# Altium PCB machkiemtranguon.PcbDoc (part 1 of 2)
Units mm, origin at the board's own origin, x right, y up, seen from the top; angles counter-clockwise.
Board outline 125.2 x 94.23 mm, 2 copper layers (Top Layer, Bottom Layer); 89 components, 67 nets, 385 pads, 74 vias.
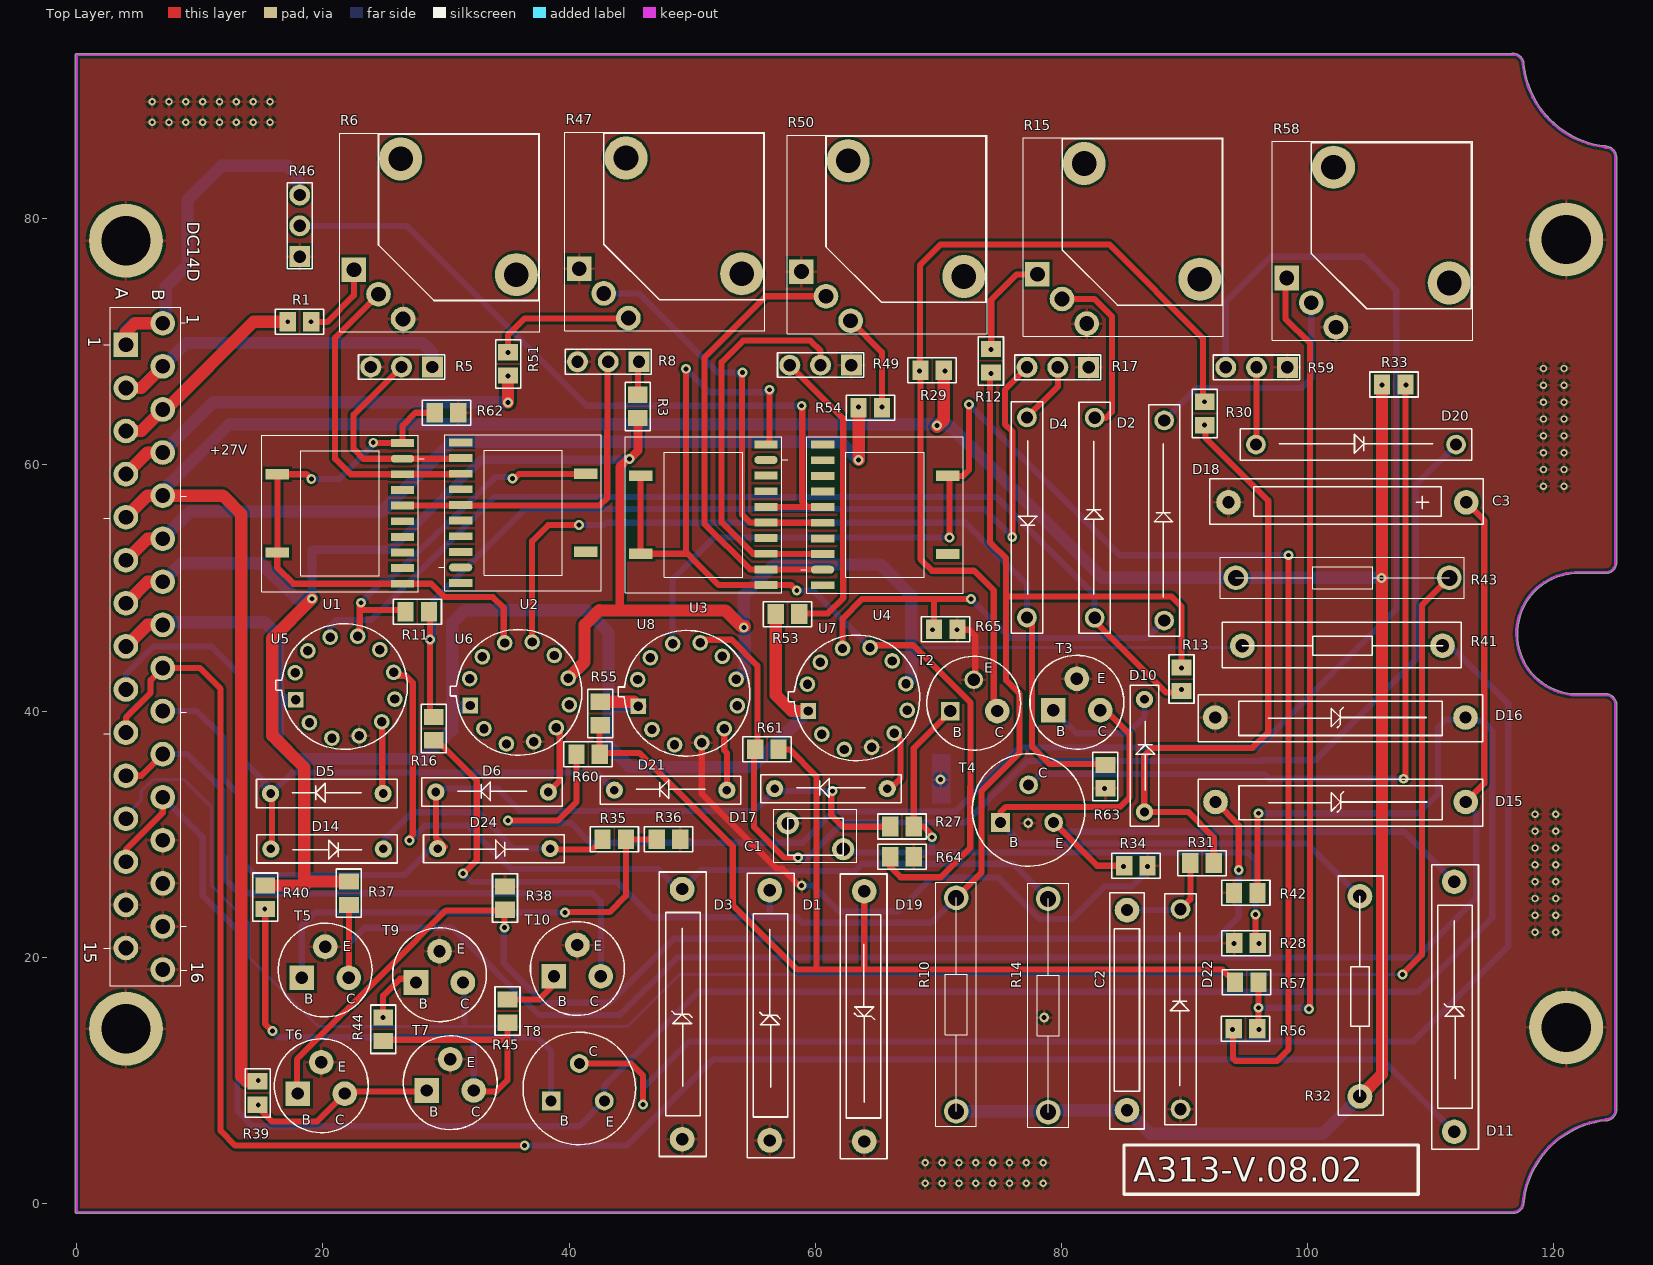
[diagram p0: Top Layer view]
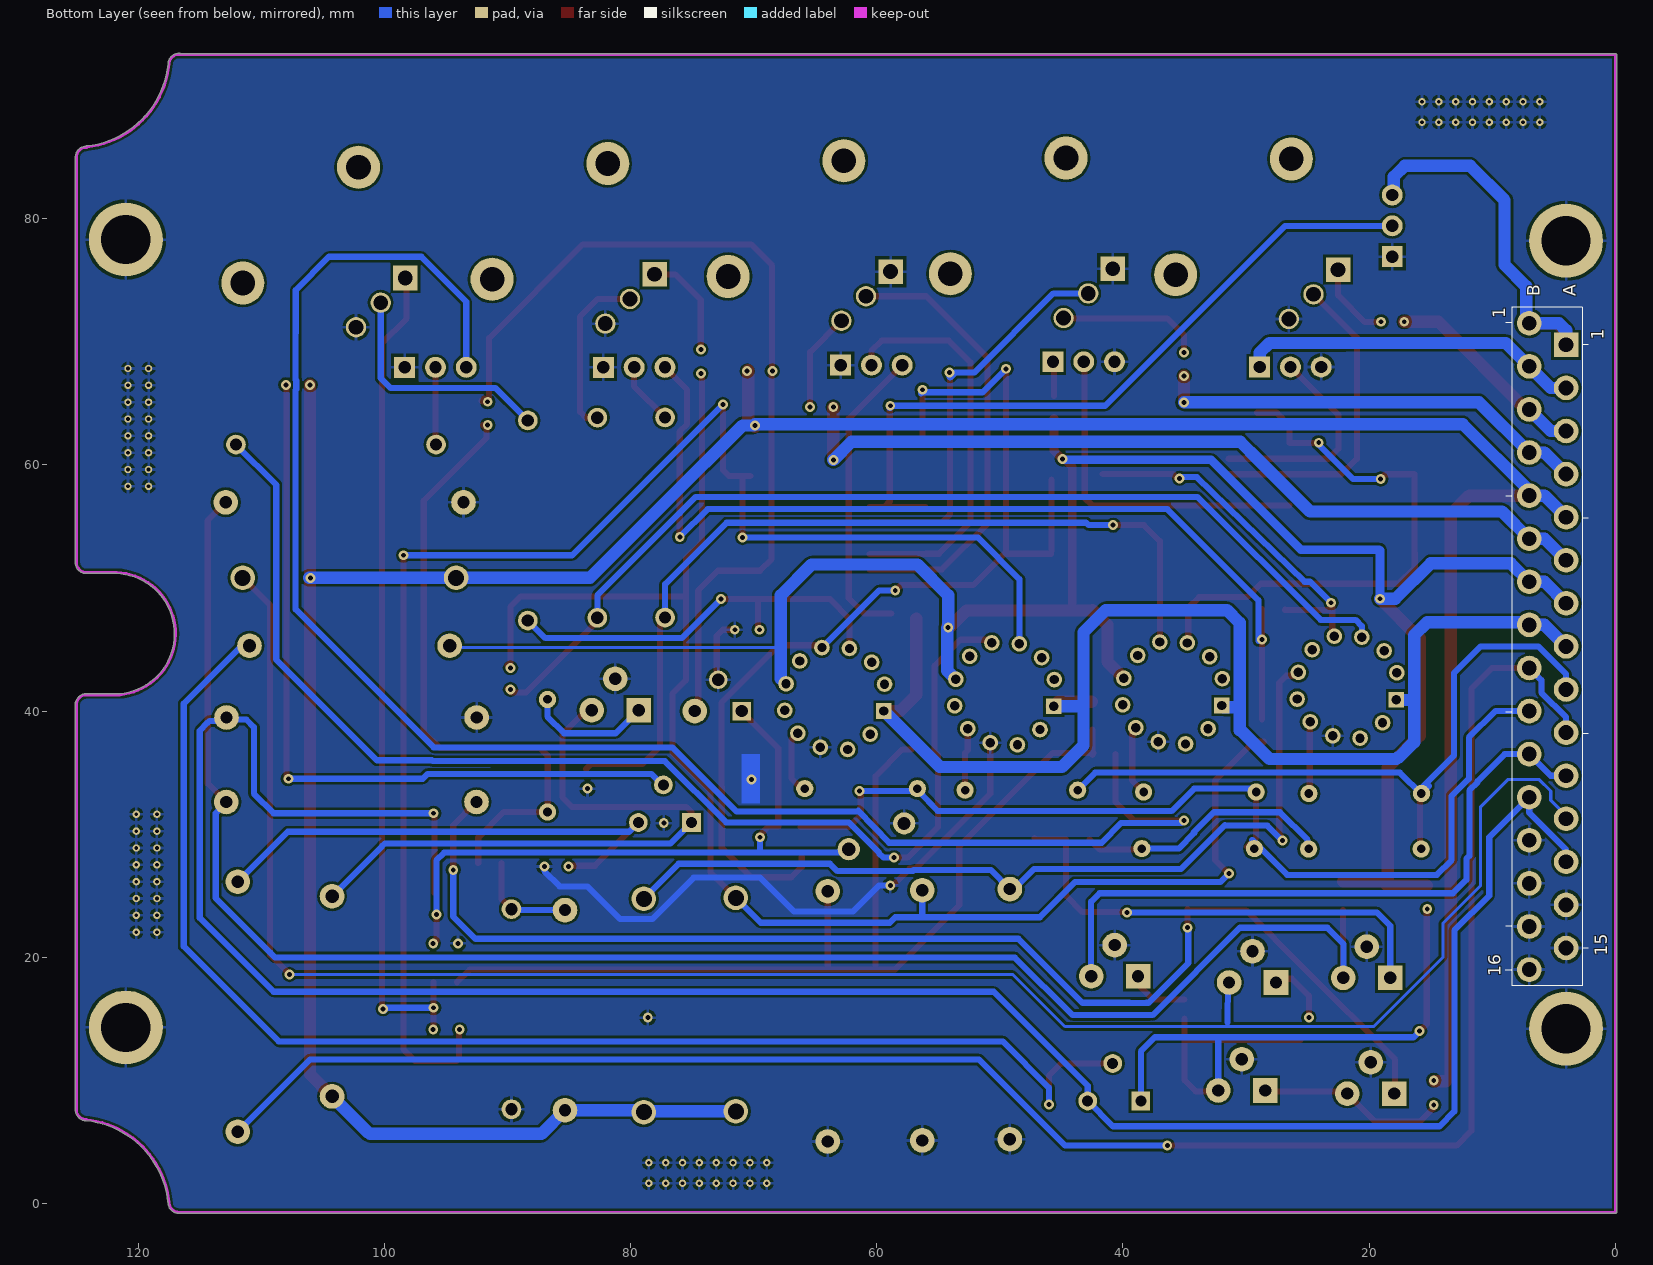
[diagram p1: Bottom Layer view, seen from below]

## Layer stack, top to bottom
Top Solder: solder mask 0.0102, Solder Resist, Dk 3.5
Top Layer: signal copper 0.0356
Dielectric1: dielectric 0.32, FR-4, Dk 4.8
Bottom Layer: signal copper 0.0356
Bottom Solder: solder mask 0.0102, Solder Resist, Dk 3.5

## Board outline
0,-0.8 116.684,-0.8 ccw(c116.697,-0.701) 116.699,-0.801 ccw(c116.684,0.088) 117.573,0.088 ccw(c116.684,0.088) 117.573,0.101 ccw(c117.476,0.125) 117.575,0.114 cw(c124.997,-0.7) 124.211,6.724 ccw(c124.222,6.824) 124.224,6.724 ccw(c124.209,7.613) 125.089,7.485 ccw(c124.997,7.525) 125.097,7.525 125.097,7.573 ccw(c124.209,7.613) 125.098,7.613 ccw(c124.209,7.613) 125.097,7.652 125.097,40.513 ccw(c124.998,40.525) 125.098,40.525 ccw(c124.998,40.525) 125.098,40.527 ccw(c124.209,40.512) 125.097,40.552 125.097,40.65 ccw(c124.997,40.65) 125.075,40.713 ccw(c124.209,40.512) 124.368,41.387 ccw(c124.318,41.3) 124.318,41.4 124.25,41.4 ccw(c124.209,40.512) 124.169,41.4 121.502,41.4 cw(c121.949,46.279) 121.779,51.176 ccw(c121.797,51.275) 121.797,51.175 124.21,51.175 ccw(c124.222,51.274) 124.224,51.174 ccw(c124.209,52.063) 125.083,51.898 ccw(c124.997,51.95) 125.097,51.95 125.097,52.023 ccw(c124.209,52.063) 125.098,52.063 ccw(c124.209,52.063) 125.097,52.102 125.097,84.993 ccw(c124.997,85.001) 125.098,85.001 ccw(c124.997,85.001) 125.098,85.002 ccw(c124.21,84.988) 124.243,85.875 ccw(c124.172,85.804) 124.183,85.903 cw(c124.997,93.325) 117.573,92.539 ccw(c117.473,92.55) 117.573,92.55 ccw(c117.473,92.55) 117.573,92.552 ccw(c116.684,92.537) 116.642,93.425 ccw(c116.647,93.325) 116.581,93.4 -0.003,93.4 ccw(c-0.003,93.3) -0.1,93.276 -0.1,-0.7 ccw(c0,-0.7)

## Design rules (kind name [scope] priority, off if disabled: settings)
Clearance [All] p1: gap=0.2 ignorepadtopadclearanceinfootprint=FALSE
HoleSize [All] p1: absolutevalues=TRUE maxlimit=5 minlimit=0.025 maxpercent=80.000 minpercent=20.000
MinimumSolderMaskSliver [All] p1: minsoldermaskwidth=0
PolygonConnect [All] p1: connectstyle=Relief reliefconductorwidth=0.254 reliefentries=4 polygonreliefangle="90 Angle" airgapwidth=0.254
RoutingVias [All] p1: holewidth=0.4 width=0.8 viastyle="Through Hole" minholewidth=0.4 minwidth=0.8 maxholewidth=0.4 maxwidth=0.8
SilkToSilkClearance [All] p1: silktosilkclearance=0.05
SilkToSolderMaskClearance [IsPad] p1: minsilkscreentomaskgap=0 clearancetoexposedcopper=TRUE
SolderMaskExpansion [All] p1: expansion=0.102
Width [All] p1: maxlimit=2 minlimit=0.254 preferedwidth=0.5 minimp=50.000000 maximp=50.000000 favimp=50.000000
26 further rules are at their usual default settings.

## Components (designator, comment, footprint, x,y, rotation, side; value= is the part's Value field where it differs from the comment)
C1 "ceramic" CAP_KM_5B 57.772,30.875 r0 top
C2 "3,3u" CAPK52_1 85.322,7.575 r90 top
C3 "15u" CAPK53_1A 93.572,56.95 r0 top
D1 "D818D" DIODE_D818 53.197,26.7 r270 top
D2 "2D510A" DIODE640_2D510 82.697,47.575 r90 top
D3 "DIODE ZENER" DIODE_D818 46.072,26.8 r270 top
D4 "2D510A" DIODE640_2D510 77.197,63.85 r270 top
D5 "2D103A" DIODE_2D103A 24.897,33.3 r180 top
D6 "2D103A" DIODE_2D103A 38.322,33.425 r180 top
D10 "2D103A" DIODE_2D103A 86.747,31.8 r90 top
D11 "2456A" DIODE_D818 108.797,27.4 r270 top
D14 "2D103A" DIODE_2D103A 15.772,28.8 r0 top
D15 "D818D" DIODE_D818 114.097,35.725 r180 top
D16 "2456A" DIODE_D818 114.083,42.586 r180 top
D17 "2D103A" DIODE_2D103A 65.847,33.7 r180 top
D18 "2D510A" DIODE640_2D510 88.347,47.35 r90 top
D19 "D818D" DIODE_D818 67.097,3.775 r90 top
D20 "2D510A" DIODE640_2D510 95.797,61.65 r0 top
D21 "2D103A" DIODE_2D103A 52.822,33.575 r180 top
D22 "2D510A" DIODE640_2D510 89.672,7.65 r90 top
D24 "2D103A" DIODE_2D103A 29.322,28.825 r0 top
DC14B "CON31" DC14B 15.66,43.726 r0 top
R1 "1,8k" RES0805 20.572,71.75 r180 top
R3 "5,6k" RES0805 45.447,67.225 r270 top
R5 "4,7k" res_var_cp5_3_4 28.937,67.95 r180 top
R6 "4,7k" res_var_cp5_3_3 21.361,70.686 r0 top
R8 "4,7k" res_var_cp5_3_4 45.722,68.375 r180 top
R10 "1,5k" RES_1W 71.447,24.825 r270 top
R11 "120k" RES0805 30.147,48.2 r180 top
R12 "4,7k" RES0805 74.147,70.925 r270 top
R13 "47k" RES0805 89.877,40.112 r90 top
R14 "1k" RES_1W 78.922,24.75 r270 top
R15 "4,7k" res_var_cp5_3_3 76.886,70.311 r0 top locked
R16 "5,1k" RES0805 28.872,41.05 r270 top
R17 "4,7k" res_var_cp5_3_4 82.247,67.925 r180 top
R27 "10k" RES0805 69.522,30.75 r180 top
R28 "2,2k" RES0805 97.47,21.277 r180 top
R29 "5,6k" RES0805 71.972,67.8 r180 top
R30 "22k" RES0805 91.522,66.65 r270 top
R31 "27k" RES0805 88.947,27.525 r0 top
R32 "3,9k" RES_05W 104.247,24.95 r270 top
R33 "150r" RES0805 104.522,66.4 r0 top
R34 "560r" RES0805 83.572,27.3 r0 top
R35 "10k" RES0805 41.197,29.45 r0 top
R36 "2,2k" RES0805 50.547,29.725 r180 top
R37 "3,3k" RES0805 22.247,22.726 r90 top
R38 "1,5k" RES0805 34.672,27.275 r270 top
R39 "27k" RES0805 14.822,6.5 r90 top
R40 "2,2k" RES0805 15.447,22.4 r90 top
R41 "390r" RES_05W 94.697,45.3 r0 top
R42 "1,5k" RES0805 92.497,25.1 r0 top
R43 "2,7k" RES_1W 94.172,50.825 r0 top
R44 "4,3k" RES0805 25.024,11.676 r90 top
R45 "8,2k" RES0805 34.872,18.1 r270 top
R46 "4,7k" res_var_cp5_3_4 18.122,76.875 r90 top
R47 "4,7k" res_var_cp5_3_3 39.661,70.761 r0 top
R49 "4,7k" res_var_cp5_3_4 62.972,68.1 r180 top
R50 "4,7k" res_var_cp5_3_3 57.711,70.536 r0 top locked
R51 "1,8k" RES0805 35.172,65.725 r90 top
R53 "5,6k" RES0805 55.272,47.75 r0 top
R54 "12k" RES0805 61.998,64.523 r0 top
R55 "330r" RES0805 42.408,42.274 r270 top
R56 "47k" RES0805 97.422,14.325 r180 top
R57 "5,1k" RES0805 97.522,18.1 r180 top
R58 "4,7k" res_var_cp5_3_3 97.136,70.011 r0 top
R59 "4,7k" res_var_cp5_3_4 98.387,67.925 r180 top
R60 "4,7k" RES0805 44.022,36.625 r180 top
R61 "47k" RES0805 58.547,37.025 r180 top
R62 "120k" RES0805 27.572,64.1 r0 top
R63 "120k" RES0805 83.447,37.15 r270 top
R64 "120k" RES0805 69.522,28.3 r180 top
R65 "120k" RES0805 73.072,46.775 r180 top
T2 "2T312B" to_2t312b_bec#1 71.097,40 r0 top
T3 "2T312B" to_2t312b_bec#2 79.472,40.075 r0 top
T4 "2T608B" to_2t608b_bce 75.047,30.95 r0 top
T5 "2T312B" to_2t312b_bec#2 18.414,18.325 r0 top
T6 "2T312B" to_2t312b_bec#2 18.097,8.925 r0 top
T7 "2T312B" to_2t312b_bec#2 28.572,9.178 r0 top
T8 "2T608B" to_2t608b_bce 38.547,8.325 r0 top
T9 "2T312B" to_2t312b_bec#2 27.697,17.95 r0 top
T10 "2T312B" to_2t312b_bec#2 38.897,18.45 r0 top
U1 "2D908A" 2D908_917A 15.042,50.086 r0 top
U2 "2D917A" 2D908_917A 42.622,62.075 r180 top
U3 "2D917A" 2D908_917A 44.567,49.981 r0 top
U4 "2D908A" 2D908_917A 72.022,61.9 r180 top
U5 "to12_pin" k140ud1_1 16.297,42.375 r0 top
U6 "to12_pin" k140ud1_1 30.472,41.9 r0 top
U7 "to12_pin" k140ud1_1 57.922,41.45 r0 top
U8 "to12_pin" k140ud1_1 44.122,41.825 r0 top

## Footprints (in the part's own frame and the unit in brackets; to place one, negate y for a bottom-side part, rotate by r counter-clockwise, add the part's x,y. Pads: shape width x height; smd on the part's side, far side on the other; paste and mask are expansions set on the pad)
2D908_917A [mil]
  oval 75x25 smd: 1(450,410)
  rect 75x25 smd: 2(450,360) 3(450,310) 4(450,260) 5(450,210) 6(450,160) 7(450,110) 8(450,60) 9(450,10) 12(450,460)
  rect 75x33 smd: 10(50,110) 11(50,360)
  silkscreen extent 0,-15 520,485
CAP_KM_5B [mm]
  round 1.8 hole 1.067: 1(4.5,-2.1) 2(0,0)
  silkscreen extent -1.14,-3.17 5.59,1.14
CAPK52_1 [mm]
  round 2 hole 1: 1(0,0) 2(16.256,0)
  silkscreen extent -1.52,-1.4 17.65,1.4
CAPK53_1A [mm]
  round 2 hole 1: 1(19.304,0) 2(0,0)
  silkscreen extent -1.52,-1.78 20.7,1.91
DC14B [mm]
  rect 2x2 hole 1.2: 1(-11.66,26.024)
  round 2 hole 1.2: 2(-8.66,27.774) 3(-11.66,22.524) 4(-8.66,24.274) 5(-11.66,19.024) 6(-8.66,20.774) 7(-11.66,15.524) 8(-8.66,17.274) 9(-11.66,12.024) 10(-8.66,13.774) 11(-11.66,8.524) 12(-8.66,10.274) 13(-11.66,5.024) 14(-8.66,6.774) 15(-11.66,1.524) 16(-8.66,3.274) 17(-11.66,-1.976) 18(-8.66,-0.226) 19(-11.66,-5.476) 20(-8.66,-3.726) 21(-11.66,-8.976) 22(-8.66,-7.226) 23(-11.66,-12.476) 24(-8.66,-10.726) 25(-11.66,-15.976) 26(-8.66,-14.226) 27(-11.66,-19.476) 28(-8.66,-17.726) 29(-11.66,-22.976) 30(-8.66,-21.226) 31(-8.66,-24.726)
  silkscreen extent -13.47,-26.03 -6.73,29.08
DIODE640_2D510 [mm]
  round 1.6 hole 1: 1(0,0) 2(16.256,0)
  silkscreen extent -1.27,-1.27 17.53,1.27
DIODE_2D103A [mm]
  round 1.4 hole 0.7: 1(0,0) 2(9.144,0)
  silkscreen extent -1.14,-1.14 10.29,1.14
DIODE_D818 [mm]
  round 2 hole 1: 1(21.581,3.112) 2(1.261,3.112)
  silkscreen extent -0.13,1.27 22.99,5.08
k140ud1_1 [mil]
  rect 50x50 hole 30: 1(59,-57)
  round 50 / inner round 60 / far side round 50 hole 30: 2(103,-131) 3(175,-180) 4(262,-173) 5(334,-128) 6(376,-55) 7(372,30) 8(328,103) 9(257,146) 10(169,143) 11(98,99) 12(57,29)
  silkscreen extent -5,-216 416,186
RES0805 [mil]
  rect 52x63 smd: 1(134.8,5) 2(60,5)
  silkscreen extent 20,-35 175,45
RES_1W [mm]
  round 2 hole 1.3: 1(17.335,0) 2(0,0)
  silkscreen extent -1.27,-1.65 18.54,1.65
RES_05W [mm]
  round 2 hole 1.092: 1(0,0) 2(16.256,0)
  silkscreen extent -1.65,-1.78 17.78,1.91
res_var_cp5_3_3 [mm]
  rect 2x2 hole 1.2: 1(1.161,5.164)
  round 2 / inner oval 2x1.524 / far side round 1.651 hole 1.2: 2(3.161,3.164) 3(5.161,1.164)
  round 3.5 hole 2: 4(4.961,14.164) 5(14.361,4.764)
  silkscreen extent 0,0.13 16.26,16.26
res_var_cp5_3_4 [mm]
  rect 1.7x1.7 hole 1: 1(0.04,0)
  round 1.7 hole 1: 2(2.54,0) 3(5.04,0)
  silkscreen extent -0.96,-1 6.04,1
to_2t312b_bec#1 [mm]
  rect 1.5x1.5 hole 1: 1(-0.127,0)
  round 1.5 hole 1: 2(1.778,2.54)
  round 2 hole 1: 3(3.683,0)
  silkscreen extent -2.03,-3.17 5.59,4.44, body extent -2.04,-3.19 5.6,4.46, height 3.81
to_2t312b_bec#2 [mm]
  rect 2x2 hole 1: 1(-0.127,0)
  round 2 hole 1: 2(1.778,2.54) 3(3.683,0)
  silkscreen extent -2.03,-3.17 5.59,4.44, body extent -2.04,-3.19 5.6,4.46, height 3.81
to_2t608b_bce [mil]
  rect 60x60 hole 35: 1(0,0)
  round 60 hole 35: 2(170,0) 3(90,120)
  silkscreen extent -90,-140 270,220

## Part data
C1: library part "CAP NP"
C2: library part "CAP NP_Dup1"
C3: library part "CAP POL"
D1 D11 D15 D16 D19: library part "DIODE ZENER"
D2 D4 D5 D6 D10 D14 D17 D18 D20 D21 D22 D24: library part DIODE
R1 R3 R10 R11 R12 R13 R14 R16 R27 R28 R29 R30 R31 R32 R33 R34 R35 R36 R37 R38 R39 R40 R41 R42 R43 R44 R45 R51 R53 R54 R55 R56 R57 R60 R61 R62 R63 R64 R65: library part RESISTOR_0
R5: library part "RESISTOR VAR_3"
R6: library part "RESISTOR VAR_4"
R8: library part "RESISTOR VAR_5"
R15 R47 R50 R58: library part "RESISTOR VAR_1"
R17: library part "RESISTOR VAR_6"
R46: library part "RESISTOR VAR_10"
R49: library part "RESISTOR VAR_7"
R59: library part "RESISTOR VAR_8"
T2 T3 T4 T5 T6 T7 T8 T9 T10: library part "NPN ECB_0"
U1: library part LDS-A81R_20
U2: library part LDS-A81R_25
U3: library part LDS-A81R_22
U4: library part LDS-A81R_21
U5: library part K140UD1B_10
U6: library part K140UD1B_9
U7: library part K140UD1B_8
U8: library part K140UD1B_13

## Free pads (board coordinates)
  round 6 hole 4: 0(4,14.2) 0(4,78.2) 0(120.997,14.3) 0(120.997,78.3)
  round 0.6 hole 0.3: 1(6.132,87.825) 1(6.132,89.5) 1(7.5,89.5) 1(7.5,87.825) 1(8.868,89.5) 1(8.868,87.825) 1(10.236,89.5) 1(10.236,87.825) 1(11.604,89.5) 1(11.604,87.825) 1(12.971,89.5) 1(12.971,87.825) 1(14.339,89.5) 1(14.339,87.825) 1(15.707,89.5) 1(15.707,87.825) 1(68.935,1.643) 1(68.935,3.318) 1(70.303,3.318) 1(70.303,1.643) 1(71.671,3.318) 1(71.671,1.643) 1(73.039,3.318) 1(73.039,1.643) 1(74.407,3.318) 1(74.407,1.643) 1(75.774,3.318) 1(75.774,1.643) 1(77.142,3.318) 1(77.142,1.643) 1(78.51,3.318) 1(78.51,1.643) 1(118.475,22.037) 1(118.475,23.405) 1(118.475,24.773) 1(118.475,26.14) 1(118.475,27.508) 1(118.475,28.876) 1(118.475,30.244) 1(118.475,31.612) 1(119.151,58.25) 1(119.151,59.618) 1(119.151,60.986) 1(119.151,62.354) 1(119.151,63.721) 1(119.151,65.089) 1(119.151,66.457) 1(119.151,67.825) 1(120.15,22.037) 1(120.15,23.405) 1(120.15,24.773) 1(120.15,26.14) 1(120.15,27.508) 1(120.15,28.876) 1(120.15,30.244) 1(120.15,31.612) 1(120.826,58.25) 1(120.826,59.618) 1(120.826,60.986) 1(120.826,62.354) 1(120.826,63.721) 1(120.826,65.089) 1(120.826,66.457) 1(120.826,67.825)

## Via types
v1: diameter 0.8, hole 0.4, Top Layer to Bottom Layer, 74 vias

## Nets (pads, with @x,y where several pads share a name; then routed paths per layer and width w, separated by ;. In a path a pad name is that pad's centre, name@x,y a point inside that pad or via, vN(x,y) a via of type N, cw(c..) or ccw(c..) an arc to the next point about the centre after c; other vN are vias at no path point)
4: D11.1 DC14B.18 DC14B.19 | length 160.4
  Top Layer w0.5: DC14B.19@4,38.25 4,39.475 6,41.475 6,42.5 DC14B.18@7,43.5 10,43.5 11.697,41.803 11.697,5.9 12.897,4.7 v1(36.397,4.7)
  Bottom Layer w0.5: DC14B.19@4,38.25 4,39.5 6,41.5 6,42.5 DC14B.18@7,43.5 ; v1@36.297,4.7 v1(36.397,4.7) 44.697,4.7 51.697,11.7 106.028,11.7 D11.1@111.909,5.819
8: D6.2 D17.2 D24.1 DC14B.20 R27.1 | length 80.5
  Top Layer w0.5: D6.2@29.178,33.7 D6.2@29.178,33.425 29.178,29.694 D24.1@29.897,28.975 ; v1@61.297,33.5 61.297,31.55 62.247,30.6 R27.1@66.172,30.6
  Bottom Layer w0.5: DC14B.20@7,40 9.75,40 11.897,37.853 11.897,34.5 13.297,33.1 13.297,27.9 14.501,26.696 26.668,26.696 29.497,29.525 ; D6.2@29.178,33.7 34.227,33.7 36.046,31.88 55.058,31.88 56.597,33.5 56.597,33.768 56.865,33.5 v1(61.397,33.5)
10: DC14B.23 R43.1 T9.3 | length 159.2
  Top Layer w0.5: v1(107.697,18.6) 109.286,20.189 109.286,48.603 R43.1@111.507,50.825
  Bottom Layer w0.254: DC14B.23@4,31.25 4,31.5 5.25,32.75 5.25,33.5 6.178,34.428 8.75,34.428 10.947,32.231 10.947,25.825 14,22.772 14,19.997 19.624,14.373 44.72,14.373 48.947,18.6 v1(107.697,18.6)
  Bottom Layer w0.5: 31.497,14.7 31.474,17.951 T9.3@31.472,18.242 ; T9.3@31.872,18.275 T9.3@31.472,18.242 ; T9.3@31.88,18.25 T9.3@31.472,18.242
16: D16.2 DC14B.24 DC14B.25 R42.1 T8.2 | length 198.9
  Top Layer w0.5: DC14B.25@4,27.75 4,28.75 7,31.75 DC14B.24@7,33 ; R42.1@95.921,25.227 v1@95.921,31.543
  Bottom Layer w0.5: DC14B.25@4,27.75 4,28.75 7,31.75 DC14B.24@7,33 10.25,29.75 10.25,25 13.072,22.178 13.072,7.475 14.273,6.274 40.814,6.274 T8.2@42.865,8.325 42.865,9.568 50.493,17.196 108.993,17.196 114.997,23.2 114.997,38.4 114.366,39.031 114.197,39.2 D16.2@112.797,39.2 ; v1(95.997,31.7) 108.997,31.7 110.597,33.3 110.597,38.7 111.197,39.3 D16.2@112.997,39.3 ; D16.2@112.822,39.475 112.897,39.4 D16.2@112.997,39.3 ; D16.2@113.097,39.3 D16.2@112.997,39.3
17: DC14B.21 DC14B.22 T10.3 | length 58.7
  Top Layer w0.5: DC14B.21@4,34.75 5.25,34.75 DC14B.22@7,36.5
  Bottom Layer w0.5: DC14B.21@4,34.75 5.25,34.75 DC14B.22@7,36.5 9,36.5 11.197,34.303 11.197,34.21 11.851,33.556 11.851,28.25 12.097,28.004 12.097,26.3 13.197,25.2 41.897,25.2 42.582,24.515 T10.3@42.582,17.925
18: D5.2 D14.1 D21.2 DC14B.17 | length 57.9
  Top Layer w0.5: D14.1@15.878,28.8 D5.2@15.878,33.625
  Bottom Layer w0.5: DC14B.17@4,41.75 4,42.991 6.259,45.25 10.947,45.25 13.097,43.1 13.097,36.4 15.753,33.744 D5.2@15.753,33.3 ; 15.153,33.9 D5.2@15.653,33.4 ; D5.2@15.697,33.2 17.497,35 42.253,35 D21.2@43.678,33.575
+5b: DC14B.3 DC14B.4 R5.1 | length 31.9
  Top Layer w1: DC14B.3@4,66.25 5.25,66.25 DC14B.4@7,68
  Bottom Layer w1: DC14B.3@4,66.25 5.25,66.25 DC14B.4@7,68 8.901,69.901 28.096,69.901 28.897,69.1 R5.1@28.897,67.95 ; 21.597,69.9 21.897,69.9
+6.3b: DC14B.5 DC14B.6 R1.1 | length 20.5
  Top Layer w1: DC14B.5@4,62.75 5.25,62.75 DC14B.6@7,64.5 7.251,64.5 14.374,71.623 v1(17.148,71.623)
  Bottom Layer w1: DC14B.5@4,62.75 5.25,62.75 DC14B.6@7,64.5
+12.6b: DC14B.13 DC14B.14 R3.1 R37.1 R40.1 R41.1 U6.7 U7.7 U8.7 | length 188.7
  Top Layer w0.7: 44.118,50.682 44.122,59.574 ; 44.122,48.325 44.122,59.574 ; 44.122,59.726 44.122,59.574 ; R3.1@45.597,63.8 45.597,61.15 v1(44.922,60.475) 44.755,60.475 44.122,59.842 44.122,59.574
  Top Layer w1: DC14B.13@4,48.75 5.75,50.5 DC14B.14@7,50.5 ; R40.1@15.32,25.824 18.497,25.824 ; v1(19.116,49.124) 15.897,45.905 15.897,38 18.497,35.4 18.497,25.824 ; R37.1@22.12,26.15 18.823,26.15 18.497,25.824 ; U6.7@39.921,42.662 41.25,43.991 41.25,47 41.276,47 42.474,48.197 52.715,48.176 54.011,46.88 v1@54.277,46.88
  Bottom Layer w0.254: 67.788,45.009 67.927,45.148 94.445,45.148 94.545,45.148 R41.1@94.697,45.3
  Bottom Layer w0.7: v1(19.116,49.124) 19.116,53.056 19.171,53.112 25.542,53.112 32.83,60.4 v1@44.697,60.4
  Bottom Layer w1: DC14B.13@4,48.75 5.75,50.5 DC14B.14@7,50.5 8.5,52 15,52 17.876,49.124 v1(19.116,49.124) ; U8.7@53.597,42.6 54.263,43.266 54.263,46.734 v1(54.197,46.8) 54.197,49.4 56.697,51.9 65.297,51.9 67.788,49.409 67.788,45.009 67.788,42.629 U7.7@67.371,42.212 ; R41.1@94.445,45.148 R41.1@94.997,45.7
+27b: C2.1 DC14B.9 DC14B.10 R10.1 R14.1 R29.2 R32.2 R33.2 R39.1 R43.2 | length 267
  Top Layer w1: DC14B.9@4,55.75 5.75,57.5 DC14B.10@7,57.5 11.875,57.5 13.375,56 13.375,10.338 13.789,9.924 R39.1@14.695,9.924 ; v1@69.897,63.1 70.448,63.651 R29.2@70.448,67.673 ; R32.2@104.247,8.694 106.046,10.493 R33.2@106.046,66.527
  Bottom Layer w1: DC14B.9@4,55.75 5.75,57.5 DC14B.10@7,57.5 7,57.903 12.397,63.3 69.897,63.3 69.997,63.2 70.897,63.2 77.056,57.056 83.287,50.825 R43.2@94.172,50.825 v1@106.097,50.825 ; R10.1@71.447,7.49 R14.1@79.322,7.49 ; R14.1@78.872,7.575 C2.1@85.322,7.575 87.247,5.65 101.172,5.65 ; 101.278,5.725 R32.2@104.247,8.694
  other v1: 14.75,10 105.997,50.8 69.897,63.2 106.032,66.496 70.529,67.623
-5b: DC14B.1 DC14B.2 R46.3 | length 31.5
  Top Layer w1: DC14B.1@4,69.75 4,70.75 4.75,71.5 DC14B.2@7,71.5
  Bottom Layer w1: DC14B.1@4,69.75 4,70.925 4.575,71.5 DC14B.2@7,71.5 7.25,71.75 7.25,74.5 9,76.25 9,81.5 11.8,84.3 17.097,84.3 17.997,83.4 R46.3@17.997,82
-6.3b: DC14B.7 DC14B.8 R51.2 | length 39.4
  Top Layer w1: DC14B.7@4,59.25 5.75,61 DC14B.8@7,61 ; v1(35.045,65.075) R51.2@35.045,67.249
  Bottom Layer w1: DC14B.7@4,59.25 5.75,61 DC14B.8@7,61 11.075,65.075 v1(35.045,65.075)
  other v1: 35.032,67.223
-12.6b: DC14B.15 DC14B.16 R53.2 R55.2 U5.1 U6.1 U7.1 U8.1 | length 110.1
  Top Layer w1: DC14B.15@4,45.25 5.75,47 DC14B.16@7,47 ; R55.2@42.535,40.75 45.248,40.75 U8.1@45.621,40.377 ; U8.1@45.621,40.4 45.772,40.4 U8.1@45.772,40.45 ; R53.2@56.797,47.5 56.797,41.3 58.095,40.002 U7.1@59.421,40.002
  Bottom Layer w1: DC14B.15@4,45.25 5.75,47 DC14B.16@7,47 7.206,47.206 15.293,47.206 16.347,46.152 16.347,37.475 17.572,36.25 17.647,36.25 17.797,36.1 ; 16.372,41.051 16.372,40.9 U5.1@17.572,40.9 ; 17.858,36.1 28.097,36.1 30.497,38.5 ; 30.52,38.423 30.52,40.303 ; U6.1@31.8,40.303 30.52,40.303 ; 43.247,40.3 43.347,40.4 U8.1@45.597,40.4 ; U7.1@59.421,40.002 54.872,35.454 44.951,35.454 43.197,37.208 43.197,46.4 41.397,48.2 31.552,48.2 30.52,47.168 30.52,40.303
-20b: DC14B.11 DC14B.12 R54.2 | length 72.1
  Top Layer w1: DC14B.11@4,52.25 5.75,54 DC14B.12@7,54 ; v1(63.522,60.401) R54.2@63.522,64.65
  Bottom Layer w1: DC14B.11@4,52.25 5.75,54 DC14B.12@7,54 9.206,56.206 24.803,56.206 28.998,60.401 30.472,61.875 62.048,61.875 v1(63.522,60.401)
  other v1: 63.529,64.698
GND: C1.2 C3.2 D1.1 D3.1 D16.1 D19.2 D22.1 DC14B.26 DC14B.27 DC14B.28 DC14B.29 DC14B.30 DC14B.31 pad.0 pad.1 R5.3 R6.3 R8.3 R15.3 R17.1 R28.1 R34.1 R36.2 R38.2 R42.2 R46.1 R47.1 R49.1 R50.1 R58.3 R59.1 R62.1 R63.1 R64.2 R65.2 T2.2 T3.2 T5.2 T6.2 T7.2 T9.2 T10.2 U5.4 U6.4 U7.4 U8.4 | length 54.2
  Top Layer w0.5: U8.4@50.777,37.431 50.777,33.287 56.864,27.2 57.32,27.2 58.696,25.824 v1(58.897,25.824) ; R65.2@71.597,46.6 72.497,46.6 73,46.097 T2.2@73,42.415
  Bottom Layer w0.5: v1(58.897,25.824) 59.823,25.824 61.941,23.706 66.703,23.706 69.472,26.475 74.863,26.475 78.239,23.1 79.605,23.1 80.847,23.1 83.497,25.75 85.747,25.75 86.997,27 v1(86.997,27.375)
  other v1: 78.597,15.1 94.012,21.123 77.297,30.9 83.497,33.7 70.183,34.428 71.529,46.602
NetC1_1: C1.1 R27.2 R28.2 T2.1 | length 54.7
  Top Layer w0.5: v1(69.497,29.75) 69.497,29.908 68.782,30.623 R27.2@67.998,30.623 67.998,36.978 T2.1@71.095,40.075 ; v1(95.773,23.465) 95.773,21.323 R28.2@95.946,21.15
  Bottom Layer w0.5: C1.1@62.097,28.3 62.31,28.513 69.497,28.513 ; v1(69.497,29.75) 69.497,28.513 ; v1(95.773,23.465) 95.773,27.864 95.137,28.5 69.497,28.513
  other v1: 96.032,21.123
NetC2_2: C2.2 D22.2 R31.2 | length 8.7
  Top Layer w0.5: D22.2@89.672,23.906 90.471,24.705 R31.2@90.471,27.652
  Bottom Layer w0.5: C2.2@85.322,23.831 D22.2@89.972,23.831
NetC3_1: C3.1 D15.2 R37.2 T5.3 | length 141.2
  Top Layer w0.5: T5.3@21.997,18.4 22.12,18.523 R37.2@22.12,23.849 ; D15.2@112.836,32.613 114.34,34.117 114.34,55.486 C3.1@112.876,56.95
  Bottom Layer w0.5: T5.3@22.072,18.275 22.072,21.075 23.397,22.4 30.497,22.4 37.597,15.3 37.791,15.3 44.097,15.3 48.772,19.975 108.872,19.975 109.397,20.5 ; 109.272,20.375 113.697,24.8 113.697,31.7 D15.2@112.822,32.575
NetD1_2: D1.2 R10.2 R12.1 R13.1 R16.1 | length 123
  Top Layer w0.5: R16.1@28.549,37.501 29.367,37.501 32.497,34.371 32.497,27.9 v1(31.397,26.8) ; R10.2@71.447,24.825 73.509,26.888 ; 73.497,26.921 73.497,33.5 76.597,36.6 76.597,41.392 75.497,42.492 75.497,52.425 74.353,53.569 74.204,53.718 R12.1@74.204,67.4 ; 75.651,49.3 88.95,49.3 89.75,48.5 89.75,43.969 R13.1@89.995,43.724
  Bottom Layer w0.5: v1(31.397,26.8) 32.097,26.1 43.897,26.1 46.747,23.25 56.308,23.25 ; D1.2@56.309,25.439 56.308,23.25 ; R10.2@71.447,24.825 69.428,22.806 58.942,22.806 58.498,23.25 56.308,23.25
  other v1: 89.75,43.5 74.282,67.423
NetD2_1: D2.1 R13.2 U5.10 | length 82.8
  Top Layer w0.5: D2.1@82.697,47.575 82.697,47.303 88.5,41.5 89.671,41.5 R13.2@89.995,41.824
  Bottom Layer w0.5: U5.10@20.59,45.732 U5.10@20.59,46.007 20.59,46.893 21.097,47.4 23.945,47.4 33.945,57.4 74.697,57.4 75.997,56.1 ; 76.037,56.052 82.697,49.392 D2.1@82.697,47.575
  other v1: 89.75,41.75
NetD2_2: D2.2 R15.2 | length 14
  Top Layer w0.5: R15.2@80.047,73.475 82.674,73.475 84.097,72.052 84.097,64.3 83.628,63.831 D2.2@82.697,63.831
NetD3_2: D3.2 R14.2 U5.7 | length 71.6
  Top Layer w0.5: U5.7@25.746,42.862 26.735,42.862 27.297,42.3 27.297,29.96 26.897,29.56 26.99,29.468 v1@26.972,29.45
  Bottom Layer w0.5: v1(27.047,29.475) 28.272,30.7 31.697,30.7 ; 31.723,30.726 35.273,27.175 47.222,27.175 49.097,25.3 D3.2@49.197,25.3 ; D3.2@49.184,25.539 50.733,27.089 56.992,27.089 57.081,27 63.2,27 63.8,27.6 76.097,27.6 R14.2@78.697,25 ; R14.2@78.684,24.987 R14.2@78.922,24.75
NetD4_1: D4.1 R17.2 | length 5.1
  Top Layer w0.5: D4.1@77.197,63.85 79.707,66.36 R17.2@79.707,67.925
NetD4_2: D4.2 R63.2 U6.9 | length 73
  Top Layer w0.5: U6.9@37,45.608 37,53.8 ; v1(40.797,55.1) 38.3,55.1 ; D4.2@77.197,47.594 77.597,47.194 77.597,37.125 79.022,35.7 83.2,35.7 R63.2@83.599,35.301 ; 37,53.8 37,53.803 38.297,55.1 38.3,55.1 ; 37,53.8 38.3,55.1
  Bottom Layer w0.5: v1(40.797,55.1) 42.797,55.1 42.997,55.3 72.197,55.3 77.197,50.3 D4.2@77.197,47.594
NetD5_1: D5.1 U5.5 | length 4.6
  Top Layer w0.5: D5.1@24.822,33.775 24.822,38.4
NetD6_1: D6.1 U6.5 | length 5.6
  Top Layer w0.5: D6.1@38.397,33.5 39.247,34.35 39.247,38.357 U6.5@38.956,38.649
NetD10_1: D10.1 R30.1 R31.1 | length 51.3
  Top Layer w0.5: D10.1@86.722,31.7 86.722,36.358 87.372,37.008 89.409,37.008 89.417,37 93.474,37 93.482,37.008 95.519,37.008 96.797,38.286 96.797,57.1 91.697,62.2 91.697,62.961 R30.1@91.966,63.231 ; D10.1@86.747,31.8 90.297,31.8 92.371,29.726 R31.1@92.371,27.652
  other v1: 91.604,63.223
NetD10_2: D10.2 T3.1 | length 10.1
  Bottom Layer w0.5: T3.1@79.345,40.075 81.22,38.2 85.397,38.2 86.747,39.55 D10.2@86.747,40.944
NetD11_2: D11.2 R34.2 T4.2 | length 41.7
  Top Layer w0.5: T4.2@79.365,30.95 82.888,27.427 R34.2@85.096,27.427
  Bottom Layer w0.5: T4.2@79.365,30.95 80.115,30.2 107.848,30.2 D11.2@111.909,26.139
  other v1: 85.029,27.373
NetD14_2: D14.2 D24.2 R35.2 | length 21.4
  Top Layer w0.5: D24.2@38.497,29 38.747,28.75 41.894,28.75 R35.2@42.721,29.577
  Bottom Layer w0.5: D14.2@24.997,28.5 24.997,29.531 27.249,31.783 32.606,31.783 34.243,30.146 ; 34.197,30.1 35.472,28.825 D24.2@38.466,28.825
NetD15_1: D15.1 R38.1 T6.1 | length 103.7
  Top Layer w0.5: T6.1@17.97,8.925 T6.1@17.97,9.027 ; T6.1@17.97,9.327 T6.1@17.97,9.027 ; T6.1@18.097,8.9 T6.1@17.97,9.027 ; v1(34.747,22.4) R38.1@34.747,23.8 ; R38.1@34.747,23.9 R38.1@34.747,23.8 ; R38.1@34.797,23.8 R38.1@34.747,23.8 ; D15.1@92.516,32.613 94.401,30.728 v1(94.401,27.102) ; T6.1@17.97,9.027 17.897,9.1 17.897,11.7 25.297,19.1 29.997,23.8 R38.1@34.747,23.8
  Bottom Layer w0.5: v1@34.822,22.425 34.697,22.3 34.697,19.525 37.922,16.3 38.064,16.3 38.089,16.275 39.455,16.275 39.48,16.3 43.297,16.3 48.497,21.5 92.597,21.5 94.401,23.304 v1(94.401,27.102)
NetD17_1: D17.1 U7.5 | length 5.4
  Top Layer w0.5: D17.1@65.797,33.475 D17.1@65.797,33.525 ; D17.1@65.897,33.5 66.936,34.539 66.936,37.668 U7.5@66.406,38.199
NetD18_1: D18.1 R65.1 U7.10 | length 33.5
  Top Layer w0.5: U7.10@62.215,45.082 62.215,47.518 63.797,49.1 v1@72.659,49.1 ; R65.1@69.648,46.648 69.648,49.049
  Bottom Layer w0.5: v1(72.659,49.098) 75.813,45.944 78.833,45.944 78.852,45.925 86.922,45.925 D18.1@88.347,47.35
  other v1: 69.529,46.602
NetD18_2: D18.2 R58.2 | length 19.5
  Bottom Layer w0.5: D18.2@88.347,63.606 90.991,66.25 99.5,66.25 100.297,67.047 R58.2@100.297,73.175
NetD19_1: D19.1 R55.1 R57.1 R60.2 R61.2 | length 90
  Top Layer w0.5: R60.2@42.397,36.6 R60.2@42.474,36.6 ; R60.2@42.474,36.423 R60.2@42.474,36.6 ; R55.1@42.474,38.501 R60.2@42.474,36.6 ; R61.2@57.183,36.886 57.911,36.886 60.097,34.7 60.097,19 ; 63.985,19.1 D19.1@63.985,25.3 ; R57.1@94.098,17.973 93.071,19 60.097,19 ; R60.2@42.474,36.6 45.697,36.6 53.297,29 53.297,24.225 58.522,19 60.097,19
NetD20_1: D20.1 R59.2 | length 6.2
  Top Layer w0.5: D20.1@95.847,61.63 95.847,64.725 ; 95.847,64.795 R59.2@95.847,67.925
NetD20_2: D20.2 R61.1 U8.9 | length 99.1
  Top Layer w0.5: U8.9@50.65,45.533 50.908,45.791 53.206,45.791 55.297,43.7 55.297,36.7 55.028,36.431 55.028,30.569 57.497,28.1 v1(58.597,28.1)
  Bottom Layer w0.5: v1@58.638,28.093 59.451,28.093 59.822,28.464 59.822,28.517 62.255,30.95 72.24,30.95 77.218,35.929 96.097,35.95 96.147,36 100.597,36 108.778,44.181 108.778,58.375 D20.2@112.053,61.65
NetD21_1: D21.1 U8.5 | length 5.1
  Top Layer w0.5: U8.5@52.606,38.574 52.606,36.817 52.822,36.601 D21.1@52.822,33.575
NetR1_2: R1.2 R6.1 | length 6.2
  Top Layer w0.5: R1.2@19.297,71.6 20.347,71.6 22.522,73.775 R6.1@22.522,75.85
  other v1: 19.032,71.623
NetR3_2: R3.2 R8.1 | length 2.8
  Top Layer w0.5: R3.2@45.597,65.6 R8.1@45.597,68.449
NetR5_2: R5.2 U1.1 U2.8 | length 17.6
  Top Layer w0.5: R5.2@26.397,67.95 22.547,64.1 22.497,64.1 22.497,61.3 23.297,60.5 U1.1@26.472,60.5 U2.8@31.422,60.5
NetR6_2: R6.2 U1.2 U2.7 | length 26.1
  Top Layer w0.5: R6.2@24.522,73.85 20.997,70.325 20.997,60.5 22.267,59.23 U1.2@26.472,59.23 U2.7@31.722,59.23
NetR8_2: R8.2 U1.4 U2.5 | length 28
  Top Layer w0.5: U1.4@26.472,56.69 U2.5@31.672,56.69 ; U2.5@31.597,56.7 42.497,56.7 43.097,57.3 43.113,68.375 R8.2@43.114,68.4
NetR11_1: R11.1 U2.10 U5.9 | length 29.9
  Top Layer w0.5: U5.9@22.797,45.7 22.997,45.9 v1@22.997,48.8 ; 23.097,48.2 23.101,48.2 26.722,48.222 R11.1@26.823,48.223 ; v1@35.447,58.75 35.957,59.26 U2.10@41.657,59.26
  Bottom Layer w0.5: v1(23.097,48.8) 24.797,50.5 25.247,50.5 33.997,59 v1@35.497,59
  other v1: 35.397,58.9
NetR11_2: R11.2 R16.2 R17.3 | length 78.1
  Top Layer w0.5: R16.2@28.697,39.3 v1(28.697,45.8) R11.2@28.697,48.3 ; v1(75.997,54.15) 75.997,62.717 75.402,63.312 75.402,66.12 R17.3@77.207,67.925
  Bottom Layer w0.5: v1@28.997,45.7 28.997,49 36.397,56.4 73.747,56.4 v1(75.997,54.15)
NetR12_2: R12.2 R15.1 | length 8.6
  Top Layer w0.5: R12.2@74.297,69.4 74.297,73.4 76.372,75.475 R15.1@78.047,75.475
  other v1: 74.282,69.373
NetR29_1: R29.1 R30.2 T2.3 | length 73
  Top Layer w0.5: R29.1@68.497,67.9 68.497,76.2 70.197,77.9 83.897,77.9 91.497,70.3 R30.2@91.497,65.126 ; R29.1@68.548,67.673 68.548,52.349 69.497,51.4 72.897,51.4 74.497,49.8 74.497,48.873 ; 74.497,48.773 74.497,40.483 T2.3@74.905,40.075 ; R30.2@91.897,65.1 91.897,65.403 R30.2@92.099,65.201
  other v1: 91.604,65.123 68.48,67.623
NetR32_1: R32.1 T3.3 T4.1 | length 51.5
  Top Layer w0.5: T4.1@75.047,30.95 75.047,31.775 75.488,32.216 84.762,32.216 85.522,32.976 85.522,38.15 T3.3@83.472,40.2
  Bottom Layer w0.5: T4.1@75.047,30.95 76.743,29.254 99.943,29.254 100.197,29 ; 100.202,28.995 R32.1@104.247,24.95
NetR33_1: R33.1 T4.3 | length 63.4
  Top Layer w0.5: v1@107.946,34.4 R33.1@107.946,66.527
  Bottom Layer w0.5: T4.3@77.322,33.725 77.322,33.9 78.322,34.9 96.482,34.9 96.882,34.5 v1(107.797,34.5) 107.832,34.5 v1@107.864,34.467
  other v1: 108,66.496
NetR35_1: R35.1 R36.1 T5.1 | length 38.9
  Top Layer w0.5: v1@39.597,23.675 43.297,23.675 44.621,24.999 R35.1@44.621,29.398 ; R35.1@44.572,29.398 R35.1@44.621,29.398 ; R36.1@47.197,29.7 47.074,29.577 R35.1@44.621,29.577 R35.1@44.621,29.398
  Bottom Layer w0.5: T5.1@18.287,18.325 18.287,22.565 19.37,23.648 v1(39.664,23.648)
NetR39_2: R39.2 T6.3 T7.1 | length 14.3
  Top Layer w0.5: R39.2@14.797,7.725 15.872,6.65 19.505,6.65 T6.3@21.78,8.925 21.955,9.1 T7.1@27.597,9.1
  other v1: 14.75,8
NetR40_2: R40.2 R44.2 R45.1 T7.3 T8.1 | length 59.8
  Top Layer w0.5: R40.2@15.32,23.924 15.32,14.577 15.797,14.1 v1@15.997,14.1 ; R44.2@25.57,13.299 34.996,13.299 34.997,13.3 ; T7.3@32.297,9.1 34.097,9.1 34.999,10.002 R45.1@34.999,14.676 R45.1@34.999,15.001
  Bottom Layer w0.5: v1(15.897,14) 16.397,13.5 37.397,13.5 38.547,12.35 T8.1@38.547,8.325 ; T7.3@32.255,8.678 T7.3@32.255,9.178 32.255,13.358
  other v1: 15.282,23.923
NetR41_2: R41.2 T8.3 | length 111.4
  Top Layer w0.5: T8.3@40.833,11.373 45.024,11.373 46.014,10.383 v1(46.014,8.027)
  Bottom Layer w0.5: v1(46.014,8.027) 46.014,9.417 49.754,13.157 108.574,13.157 116.297,20.88 116.297,40.6 111.597,45.3 R41.2@110.953,45.3
NetR44_1: R44.1 T9.1 | length 5.5
  Top Layer w0.5: v1(24.897,15.1) 24.897,16.871 26.276,18.25 T9.1@28.07,18.25
NetR45_2: R45.2 T10.1 | length 4.3
  Top Layer w0.5: R45.2@34.999,16.576 37.573,16.576 T10.1@38.797,17.8
NetR46_2: R46.2 U3.4 U4.5 | length 59.9
  Top Layer w0.5: U3.4@56.047,56.566 59.4,56.566 ; v1@58.943,64.618 58.943,57.023 59.4,56.566 ; U4.5@60.592,56.566 59.4,56.566
  Bottom Layer w0.5: R46.2@17.997,79.4 26.85,79.4 41.45,64.8 58.761,64.8 v1@58.943,64.618
  other v1: 58.897,64.8
NetR47_2: R47.2 U3.5 U4.4 | length 32.8
  Top Layer w0.5: v1(54.097,67.5) 54.041,67.444 54.041,55.975 54.701,55.315 U3.5@55.997,55.315 ; U3.5@56.097,55.296 U4.4@60.592,55.296
  Bottom Layer w0.5: R47.2@42.822,73.925 45.648,73.925 52.073,67.5 53.622,67.5 54.041,67.082 54.097,67.138 v1(54.097,67.5)
NetR47_3: R47.3 R51.1 | length 11.7
  Top Layer w0.5: R51.1@35.045,69.149 35.045,70.548 36.397,71.9 R47.3@44.797,71.9
  other v1: 35.032,69.123
NetR49_2: R49.2 U3.7 U4.2 | length 32.5
  Top Layer w0.5: U3.7@55.997,52.775 54.955,52.775 52.39,55.34 52.39,68.352 54.138,70.1 59.597,70.1 60.432,69.265 R49.2@60.432,68.1 ; U3.7@56.097,52.756 U4.2@60.592,52.756
NetR49_3: R49.3 R53.1 | length 24.7
  Top Layer w0.5: R49.3@57.932,68.1 62.27,63.762 62.27,49.173 61.024,47.927 R53.1@58.797,47.927